# Altium PCB sciencelayout.PcbDoc
Units mil, origin at the board's own origin, x right, y up, seen from the top; angles counter-clockwise.
Board outline 2500 x 3500 mil, 2 copper layers (Top Layer, Bottom Layer); 97 components, 50 nets, 295 pads, 0 vias.
Unrouted connection lines stored in the file: 199.
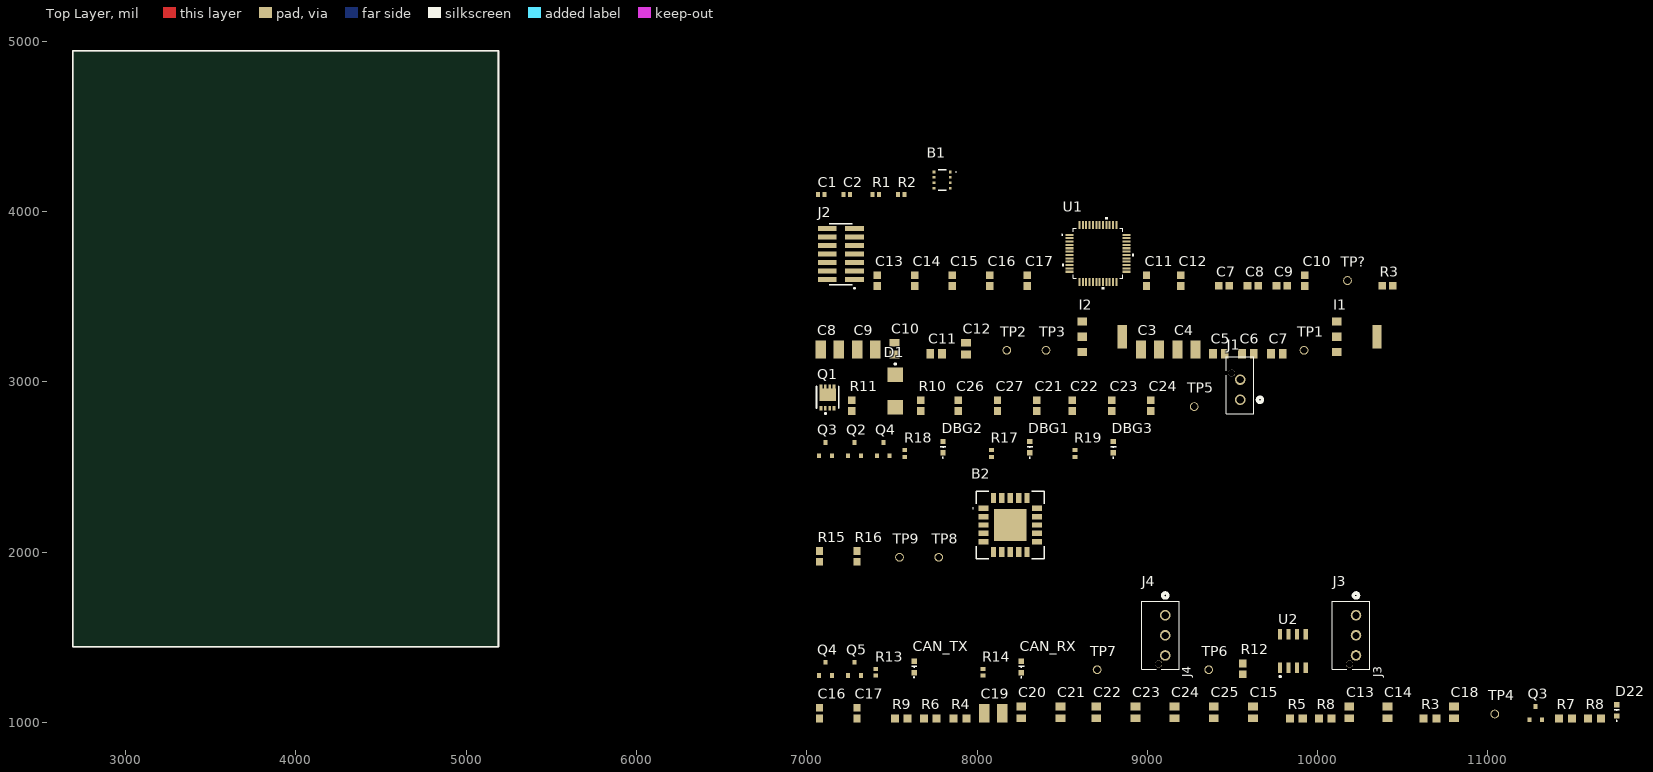
[diagram p0: Top Layer view]
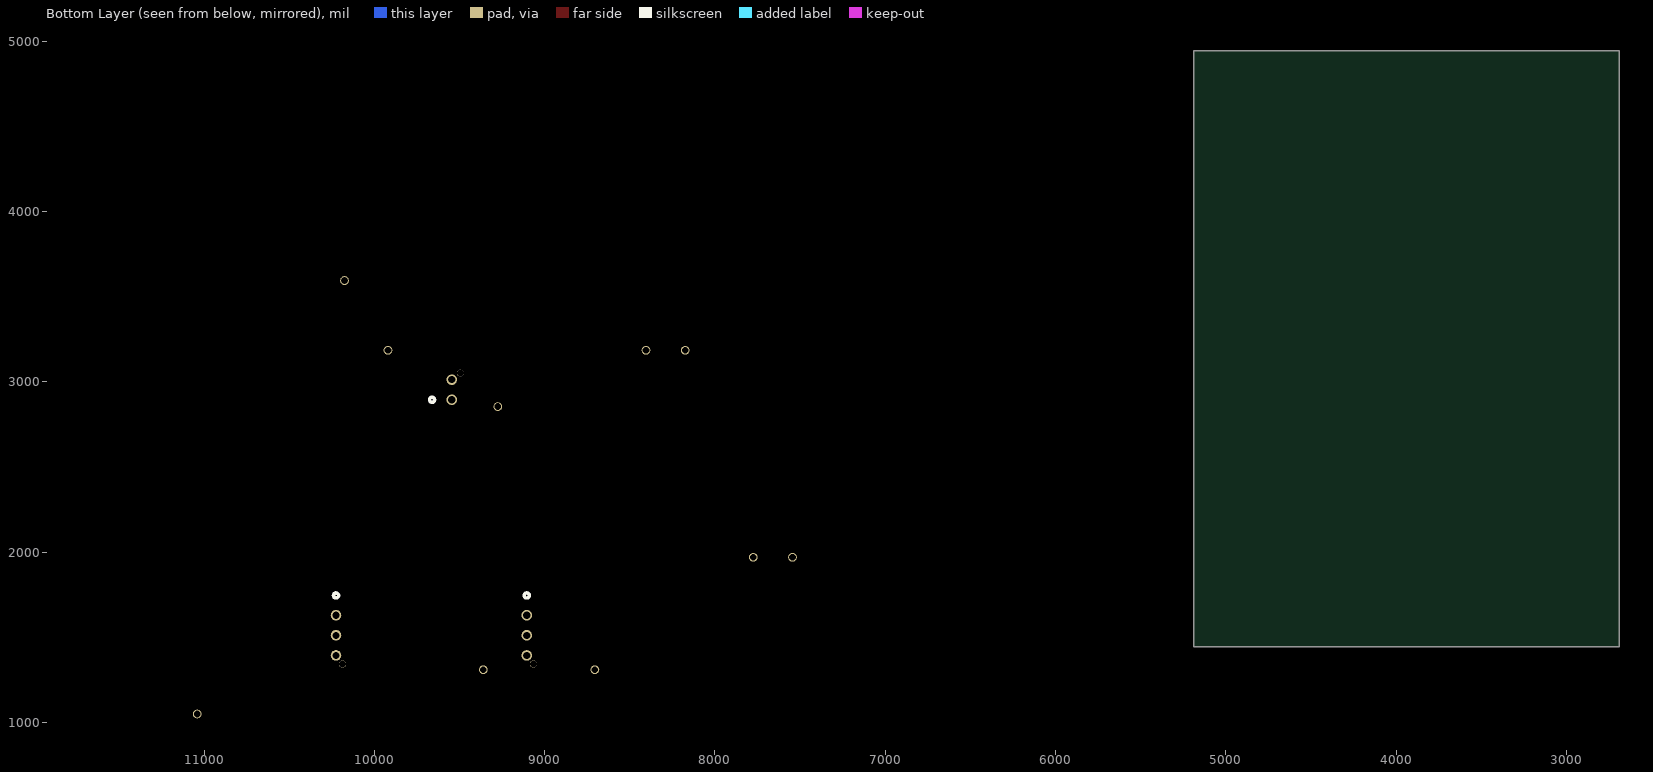
[diagram p1: Bottom Layer view, seen from below]

## Layer stack, top to bottom
Top Solder: solder mask 0.4, Solder Resist, Dk 3.5
Top Layer: signal copper 1.4
Dielectric 1: dielectric 12.6, FR-4, Dk 4.8
Bottom Layer: signal copper 1.4
Bottom Solder: solder mask 0.4, Solder Resist, Dk 3.5

## Board outline
2690,1445 2690,4945 5190,4945 5190,1445

## Design rules (kind name [scope] priority, off if disabled: settings)
Clearance [All] p1: gap=10 ignorepadtopadclearanceinfootprint=FALSE
PolygonConnect [All] p1: connectstyle=Relief reliefconductorwidth=10 reliefentries=4 polygonreliefangle="90 Angle" airgapwidth=10
RoutingVias [All] p1: holewidth=28 width=50 viastyle="Through Hole" minholewidth=28 minwidth=50 maxholewidth=28 maxwidth=50
SolderMaskExpansion [All] p1: expansion=0 istentingtop=FALSE
SupplyNets "Schematic Supply Nets_6" [InNet('VDD')] p1: voltage=0.000
SupplyNets "Schematic Supply Nets_5" [InNet('7V')] p2: voltage=0.000
SupplyNets "Schematic Supply Nets_4" [InNet('VBAT')] p3: voltage=0.000
SupplyNets "Schematic Supply Nets_3" [InNet('GND')] p4: voltage=0.000
SupplyNets "Schematic Supply Nets_2" [InNet('VBAT_FUSED_7')] p5: voltage=0.000
SupplyNets "Schematic Supply Nets_1" [InNet('5V')] p6: voltage=0.000
Width [All] p1: maxlimit=10 minlimit=10 preferedwidth=10
30 further rules are at their usual default settings.

## Classes and differential pairs
component class THP_Sensor: B1 C1 C2 R1 R2
component class MCU: C7 C8 C9 C10 C11 C12 C13 C14 C15 C16 C17 J2 R3 TP? U1
component class LDOs: C3 C4 C5 C6 C7 C8 C9 C10 C11 C12 I1 I2 TP1 TP2 TP3
component class "Input Power": C21 C22 C23 C24 C26 C27 D1 J1 Q1 R10 R11 TP5
component class Headers: J4 J5 J6 M2
component class "Debugging LED": DBG1 DBG2 DBG3 Q2 Q3 Q4 R17 R18 R19
component class CO2_Sensor: B2 R15 R16 TP8 TP9
component class CAN: CAN_RX CAN_TX J3 J4 Q4 Q5 R12 R13 R14 TP6 TP7 U2
component class "7V Buck": C13 C14 C15 C16 C17 C18 C19 C20 C21 C22 C23 C24 C25 D22 D23 L2 Q3 R3 R4 R5 R6 R7 R8 R9 TP4 U9

## Components (designator, comment, footprint, x,y, rotation, side; value= is the part's Value field where it differs from the comment)
B1 "BME688" BME688 7795,4185 r0 top
B2 "SCD43-D-R2" SCD43DR2 8195,2160 r0 top
C1 "CAP 0402" CAP-0402 7085,4100 r0 top
C2 "CAP 0402" CAP-0402 7235,4100 r0 top
C3 "CL32B106KMVNNWE" CAP-1210 9015,3190 r0 top
C4 "CL32B106KMVNNWE" CAP-1210 9230,3190 r0 top
C5 "CL21B104KBCNNNC" CAP-0805 9420,3165 r0 top
C6 "C0805C471K5RACTU" CAP-0805 9590,3165 r0 top
C7 "CAP 0603" CAP-0603 9450,3565 r0 top
C7 "CC0805JKX7R9BB105" CAP-0805 9760,3165 r0 top
C8 "CAP 0603" CAP-0603 9620,3565 r0 top
C8 "CL32B106KMVNNWE" CAP-1210 7135,3190 r0 top
C9 "CL32B106KMVNNWE" CAP-1210 7350,3190 r0 top
C9 "CAP 0603" CAP-0603 9790,3565 r0 top
C10 "CAP 0603" CAP-0603 9925,3595 r90 top
C10 "CL21B104KBCNNNC" CAP-0805 7515,3195 r90 top
C11 "CAP 0603" CAP-0603 8995,3595 r90 top
C11 "C0805C471K5RACTU" CAP-0805 7760,3165 r0 top
C12 "CAP 0603" CAP-0603 9195,3595 r90 top
C12 "CC0805JKX7R9BB105" CAP-0805 7935,3195 r90 top
C13 "CAP 0603" CAP-0603 7415,3595 r90 top
C13 "CAP 0805" CAP-0805 10185,1060 r90 top
C14 "CAP 0603" CAP-0603 7635,3595 r90 top
C14 "CAP 0805" CAP-0805 10410,1060 r90 top
C15 "CAP 0805" CAP-0805 9620,1060 r90 top
C15 "CAP 0603" CAP-0603 7855,3595 r90 top
C16 "GCM1885C1H302FA16J" CAP-0603 7075,1055 r90 top
C16 "CAP 0603" CAP-0603 8075,3595 r90 top
C17 "CAP 0603" CAP-0603 8295,3595 r90 top
C17 "CL10C6R8CB8NNNC" CAP-0603 7295,1055 r90 top
C18 "CL21B104KBCNNNC" CAP-0805 10800,1060 r90 top
C19 "CL32B106KMVNNWE" CAP-1210 8095,1055 r0 top
C20 "CC0805JKX7R9BB105" CAP-0805 8260,1060 r90 top
C21 "GCM188R71H104KA57D" CAP-0603 8350,2860 r90 top
C21 "CL21B104KBCNNNC" CAP-0805 8490,1060 r90 top
C22 "GRM1885C1H103JA01D" CAP-0603 8560,2860 r90 top
C22 "C0805C103K5RACTU" CAP-0805 8700,1060 r90 top
C23 "GRM1885C1H102JA01D" CAP-0603 8790,2860 r90 top
C23 "CL21B102KBANNNC" CAP-0805 8930,1060 r90 top
C24 "CL21C101JBANNNC" CAP-0805 9160,1060 r90 top
C24 "GRM1885C1H101JA01D" CAP-0603 9020,2860 r90 top
C25 "CL21C100CBANNNC" CAP-0805 9390,1060 r90 top
C26 "GRJ32ER71H106KE11L" CAP-0603 7890,2860 r90 top
C27 "GRJ32ER71H106KE11L" CAP-0603 8120,2860 r90 top
CAN_RX "BL-HKC36G-AV-TRB" LED-0603 8290,1270 r90 top
CAN_TX "BL-HKC36G-AV-TRB" LED-0603 7660,1270 r90 top
D1 "SMBJ40CA" "DO-214AA (SMBJ)" 7520,2945 r90 top
D22 "BL-HKC36G-AV-TRB" LED-0603 11785,1015 r90 top
DBG1 "BL-HKC36G-AV-TRB" LED-0603 8340,2560 r90 top
DBG2 "BL-HKC36G-AV-TRB" LED-0603 7830,2560 r90 top
DBG3 "BL-HKC36G-AV-TRB" LED-0603 8830,2560 r90 top
I1 "LM1117IMPX-3.3/NOPB" IC-SOT-223-4 10230,3265 r0 top
I2 "LM1117MPX-5.0/NOPB" IC-SOT-223-4 8735,3265 r0 top
J1 "2068320201" CONN_2068320000-SD_02_MOL 9545,2895 r0 top
J2 "FTSH-107-01-L-DV-K" SAMTEC_FTSH-107-01-L-DV-K 7200,3750 r90 top
J3 "2165712003" CONN_2165710003-SD_03_MOL 10225,1630 r90 top
J4 "2165712003" CONN_2165710003-SD_03_MOL 9105,1630 r90 top
Q1 "CSD18543Q3AT" IC-8VSONCLIP 7050,2810 r0 top
Q2 "T2N7002AK,LM" IC-SOT23-3 7280,2605 r0 top
Q3 "T2N7002AK,LM" IC-SOT23-3 7110,2605 r0 top
Q3 "T2N7002AK,LM" IC-SOT23-3 11280,1055 r0 top
Q4 "T2N7002AK,LM" IC-SOT23-3 7450,2605 r0 top
Q4 "T2N7002AK,LM" IC-SOT23-3 7110,1315 r0 top
Q5 "T2N7002AK,LM" IC-SOT23-3 7280,1315 r0 top
R1 "RES 0402" RES-0402 7405,4100 r0 top
R2 "RES 0402" RES-0402 7555,4100 r0 top
R3 "RES 0603" RES-0603 10410,3565 r0 top
R3 "CRCW08052M15FKEA" RES-0805 10660,1025 r0 top
R4 "ERA-6AEB104V" RES-0805 7900,1025 r0 top
R5 "RC0805FR-07178KL" RES-0805 9875,1025 r0 top
R6 "RC0805FR-0736K5L" RES-0805 7725,1025 r0 top
R7 "CRCW08051K00FKEA" RES-0805 11455,1025 r0 top
R8 "ERJ-6GEYJ241V" RES-0805 11625,1025 r0 top
R8 "CRCW080580K6FKEA" RES-0805 10045,1025 r0 top
R9 "RT0805BRD0710K4L" RES-0805 7555,1025 r0 top
R10 "RC0603JR-07200KL" RES-0603 7670,2860 r90 top
R11 "RC0603FR-07100KL" RES-0603 7265,2860 r90 top
R12 "RES 0603" RES-0603 9560,1315 r90 top
R13 "RES 0402" RES-0402 7405,1295 r90 top
R14 "RES 0402" RES-0402 8035,1295 r90 top
R15 "RES 0603" RES-0603 7075,1975 r90 top
R16 "RES 0603" RES-0603 7295,1975 r90 top
R17 "RES 0402" RES-0402 8085,2580 r90 top
R18 "RES 0402" RES-0402 7575,2580 r90 top
R19 "RES 0402" RES-0402 8575,2580 r90 top
TP1 "5003" TEST-POINT-0001 9920,3185 r0 top
TP2 "5003" TEST-POINT-0001 8175,3185 r0 top
TP3 "5003" TEST-POINT-0001 8405,3185 r0 top
TP4 "5003" TEST-POINT-0001 11040,1050 r0 top
TP5 "5003" TEST-POINT-0001 9275,2855 r0 top
TP6 "5003" TEST-POINT-0001 9360,1310 r0 top
TP7 "5003" TEST-POINT-0001 8705,1310 r0 top
TP8 "5003" TEST-POINT-0001 7775,1970 r0 top
TP9 "5003" TEST-POINT-0001 7545,1970 r0 top
TP? "5003" TEST-POINT-0001 10175,3595 r0 top
U1 "STM32G431CBT6" IC-LQFP48 8710,3755 r0 top
U2 "TCAN1044VDRQ1" IC-8SOIC 9855,1420 r0 top

## Footprints (in the part's own frame and the unit in brackets; to place one, negate y for a bottom-side part, rotate by r counter-clockwise, add the part's x,y. Pads: shape width x height; smd on the part's side, far side on the other; paste and mask are expansions set on the pad)
BME688 [mm]
  rect 0.4x0.4 smd: 1(1.2,1.2) 2(1.2,0.4) 3(1.2,-0.4) 4(1.2,-1.2) 5(-1.2,-1.2) 6(-1.2,-0.4) 7(-1.2,0.4) 8(-1.2,1.2)
  silkscreen extent -0.6,-1.5 2.1,1.5
CAP-0402 [mm]
  rect 0.6x0.7 smd: 1(-0.5,0) 2(0.5,0)
  body extent -0.5,-0.22 0.5,0.23, height 0.5
CAP-0603 [mm]
  rect 1.15x1.1 smd: 1(-0.8,0) 2(0.8,0)
  body extent -0.8,-0.45 0.8,0.45, height 0.8
CAP-0805 [mm]
  rect 1.16x1.47 smd: 1(-0.88,0) 2(0.88,0)
  body extent -1,-0.63 1,0.63, height 0.94
CAP-1210 [mm]
  rect 1.53x2.72 smd: 1(-1.341,0) 2(1.341,0)
  body extent -1.6,-1.25 1.6,1.25, height 2.7
CONN_2068320000-SD_02_MOL [mil]
  round 62 / inner round 60 / far side round 62 hole 42 paste-99999 mask+0: 1(0,0) 2(0,118.11)
  round 40 / inner round 60 / far side round 40 hole 40 unplated paste-99999 mask+0: 3(-50.39,156.69)
  silkscreen extent -81,-81 131,254, body extent -76,-76 76,249, height 392
CONN_2165710003-SD_03_MOL [mil]
  round 62 hole 42 paste-99999 mask+0: 1(0,0) 2(-118.11,0) 3(-236.22,0)
  round 42 hole 42 unplated paste-99999 mask+0: 4(-286.61,38.58)
  silkscreen extent -317,-81 131,139, body extent -312,-75 76,135, height 394
"DO-214AA (SMBJ)" [mm]
  rect 2.16x2.26 smd: 1(-2.416,0) 2(2.484,0)
  silkscreen extent 3.94,-0.13 4.19,0.12, body extent -2.72,-1.95 2.78,1.95, height 2.45
IC-8SOIC [mm]
  rect 0.6x1.5 smd: 1(-1.905,-2.5) 2(-0.635,-2.5) 3(0.635,-2.5) 4(1.905,-2.5) 5(1.905,2.5) 6(0.635,2.5) 7(-0.635,2.5) 8(-1.905,2.5)
  silkscreen extent -2.03,-3.93 -1.78,-3.69, body extent -2.45,-3 2.45,3, height 1.75
IC-8VSONCLIP [mm]
  rect 0.4x0.7 smd paste-100 mask+0.05: 1(2.812,0.877) 2(0.862,0.877) 2(1.512,0.877) 2(2.162,0.877) 3(0.862,4.077) 3(1.512,4.077) 3(2.162,4.077) 3(2.812,4.077)
  rect 2.45x1.9 smd paste-100 mask+0.05: 3(1.837,2.917)
  silkscreen extent 0.19,0.03 3.49,4.18, body extent 0.18,0.89 3.48,4.19, height 1.1
IC-LQFP48 [mil]
  rect 47x12 smd paste+0 mask+0: 1(-167.32,108.27) 2(-167.32,88.58) 3(-167.32,68.9) 4(-167.32,49.21) 5(-167.32,29.53) 6(-167.32,9.84) 7(-167.32,-9.84) 8(-167.32,-29.53) 9(-167.32,-49.21) 10(-167.32,-68.9) 11(-167.32,-88.58) 12(-167.32,-108.27) 25(167.32,-108.27) 26(167.32,-88.58) 27(167.32,-68.9) 28(167.32,-49.21) 29(167.32,-29.53) 30(167.32,-9.84) 31(167.32,9.84) 32(167.32,29.53) 33(167.32,49.21) 34(167.32,68.9) 35(167.32,88.58) 36(167.32,108.27)
  rect 12x47 smd paste+0 mask+0: 13(-108.27,-167.32) 14(-88.58,-167.32) 15(-68.9,-167.32) 16(-49.21,-167.32) 17(-29.53,-167.32) 18(-9.84,-167.32) 19(9.84,-167.32) 20(29.53,-167.32) 21(49.21,-167.32) 22(68.9,-167.32) 23(88.58,-167.32) 24(108.27,-167.32) 37(108.27,167.32) 38(88.58,167.32) 39(68.9,167.32) 40(49.21,167.32) 41(29.53,167.32) 42(9.84,167.32) 43(-9.84,167.32) 44(-29.53,167.32) 45(-49.21,167.32) 46(-68.9,167.32) 47(-88.58,167.32) 48(-108.27,167.32)
  silkscreen extent -214,-211 211,211, body extent -177,-177 177,177, height 63
IC-SOT23-3 [mm]
  rect 0.6x0.7 smd: 1(-0.95,-1) 2(0.95,-1) 3(0,1)
  body extent -1.46,-1.18 1.46,1.19, height 1.12
IC-SOT-223-4 [mm]
  rect 1.4x1.2 smd mask+0.07: 1(-3,2.3) 3(-3,-2.3) 4(-3,0)
  rect 1.4x3.5 smd: 2(3,0)
  body extent -3.5,-3.25 3.5,3.25, height 1.68
LED-0603 [mm]
  rect 0.8x0.8 smd: 1(2.291,0.751) 2(0.589,0.751)
  silkscreen extent -0.2,0.34 1.52,1.13, body extent 0.65,0.36 2.25,1.16, height 0.39
RES-0402 [mm]
  rect 0.6x0.7 smd: 1(-0.5,0) 2(0.5,0)
  body extent -0.5,-0.25 0.5,0.25, height 0.3
RES-0603 [mm]
  rect 1.15x1.1 smd: 1(-0.8,0) 2(0.8,0)
  body extent -0.8,-0.4 0.8,0.4, height 0.43
RES-0805 [mm]
  rect 1.2x1.2 smd: 1(-0.95,0) 2(0.95,0)
  body extent -1,-0.6 1,0.6, height 0.71
SAMTEC_FTSH-107-01-L-DV-K [mm]
  rect 0.74x2.79 smd: 01(-3.81,-2.035) 02(-3.81,2.035) 03(-2.54,-2.035) 04(-2.54,2.035) 05(-1.27,-2.035) 06(-1.27,2.035) 07(0,-2.035) 08(0,2.035) 09(1.27,-2.035) 10(1.27,2.035) 11(2.54,-2.035) 12(2.54,2.035) 13(3.81,-2.035) 14(3.81,2.035)
  silkscreen extent -5.19,-2.13 4.53,1.72, body extent -4.44,-2.82 4.44,3.02, height 5.96
SCD43DR2 [mm]
  rect 1.5x0.8 smd: 1(-4,2.5) 2(-4,1.25) 3(-4,0) 4(-4,-1.25) 5(-4,-2.5) 11(4,-2.5) 12(4,-1.25) 13(4,0) 14(4,1.25) 15(4,2.5)
  rect 0.8x1.5 smd: 6(-2.5,-4) 7(-1.25,-4) 8(0,-4) 9(1.25,-4) 10(2.5,-4) 16(2.5,4) 17(1.25,4) 18(0,4) 19(-1.25,4) 20(-2.5,4)
  rect 4.8x4.8 smd: 21(0,0)
  silkscreen extent -5.6,-5.05 5.05,5.05
TEST-POINT-0001 [mm] "2024 miniature test point"
  round 1.3 hole 1: 1(0,0)
  body extent -1.27,-1.27 1.27,1.27, height 4.57

## Part data
B1: "Gas sensor measuring relative humidity, barometric pressure, ambient temperature and gas (VOC)", Manufacturer_Name=BOSCH, Mouser Part Number=262-BME688, Arrow Part Number=BME688, Arrow Price/Stock=https://www.arrow.com/en/products/bme688/bosch-sensortec.html?utm_currency=USD&region=nac, Datasheet Link=https://www.bosch-sensortec.com/media/boschsensortec/downloads/datasheets/bst-bme688-ds000.pdf, Geometry.Height=1mm, Manufacturer_Part_Number=BME688, Mouser Price/Stock=https://www.mouser.co.uk/ProductDetail/Bosch-Sensortec/BME688?qs=IS%252B4QmGtzzqQoVDscqwx3A%3D%3D
B2: "Carbon Dioxide (CO2) Sensor Voltage 2.4V ~ 5.5V , 205mA , 400 kHz  -10C ~ 60C", Manufacturer_Name=Sensirion, Datasheet Link=https://sensirion.com/media/documents/48C4B7FB/67FE0194/CD_DS_SCD4x_Datasheet_D1.pdf, Geometry.Height=6.8mm, Manufacturer_Part_Number=SCD43-D-R2
C1 C2: capacitor=100nF, Voltage Rating=V
C3 C4 C8 C9 C19: library part "CAP 1210", Capacitance="10 uF", Voltage Rating=50V
C5 C10: library part "CAP 0805", Capacitance="100 nF", Voltage Rating=16V
C6 C11: library part "CAP 0805", Capacitance="470 pF", Voltage Rating=50V
C7 C8 C9 C11 C16 C17: Capacitance="100 nF", Voltage Rating=16V
C7 C12: library part "CAP 0805", Capacitance="1 uF", Voltage Rating=16V
C10 C12: Capacitance="4.7 uF", Voltage Rating=16V
C13: Capacitance="10 nF", Voltage Rating=50V
C13 C14: Capacitance="2.2 uF", Voltage Rating=V
C14 C15: Capacitance="1 uF", Voltage Rating=16V
C15: Capacitance="2.7 nF", Voltage Rating=V
C16: library part "CAP 0603", Capacitance="3 nF", Voltage Rating=V
C17: library part "CAP 0603", Capacitance=6.8F, Voltage Rating=V
C18 C21: library part "CAP 0805", Capacitance="100 nF", Voltage Rating=V
C20: library part "CAP 0805", Capacitance=1uF, Voltage Rating=V
C21: library part "CAP 0603", Capacitance=100nF, Voltage Rating=50V
C22: library part "CAP 0603", Capacitance=10nF, Voltage Rating=50V
C22: library part "CAP 0805", Capacitance="10 nF", Voltage Rating=V
C23: library part "CAP 0603", Capacitance=1nF, Voltage Rating=50V
C23: library part "CAP 0805", Capacitance="1 nF", Voltage Rating=V
C24: library part "CAP 0805", Capacitance="100 pF", Voltage Rating=V
C24: library part "CAP 0603", Capacitance=100pF, Voltage Rating=50V
C25: library part "CAP 0805", Capacitance="10 pF", Voltage Rating=V
C26: library part "CAP 0603", Capacitance=10uF, Voltage Rating=50V
C27: library part "CAP 0603", Capacitance=1uF, Voltage Rating=50V
CAN_RX CAN_TX D22 DBG1 DBG2 DBG3: library part LED-0001, "LED YELLOW CLEAR 0603 SMD", Forward Current=30mA, Forward Voltage=2V, ComponentLink1Description=Datasheet, ComponentLink1URL=https://www.americanbrightled.com/pdffiles/led-components/smt/BL-HKC36G-AV-TRB.pdf
D1: library part DIO-TVS-0001, "TVS DIODE 40VWM 64.5VC DO214AA", Current Rating=9.3A, Voltage Rating=64.5V, ComponentLink1Description=Datasheet, ComponentLink1URL=https://www.littelfuse.com/media?resourcetype=datasheets&itemid=09a6ae9a-73cb-4ac4-acac-e6dab92ab953&filename=littelfuse_tvs_diode_smbj_datasheet.pdf
I1: library part IC_LDO_3V3_0001, "IC REG LIN 3.3V 800MA SOT223-4", ComponentLink1Description="New link", ComponentLink1URL=https://www.ti.com/lit/ds/symlink/lm1117.pdf?HQS=dis-dk-null-digikeymode-dsf-pf-null-wwe&ts=1721700739746
I2: library part IC_LDO_5V_0001, "IC REG LINEAR 5V 800MA SOT223-4", ComponentLink1Description=Datasheet, ComponentLink1URL=https://www.ti.com/lit/ds/symlink/lm1117.pdf?HQS=dis-dk-null-digikeymode-dsf-pf-null-wwe&ts=1721700739746
J1: library part "CONN MF+ 2 PIN VERT", "Micro-Fit+ Vertical Header, Through Hole, 3.00mm Pitch, Dual Row, 2 Circuits, Tin (Sn) Plating, Glow-Wire Capable, Black, Tray", Manufacturer_Name="Molex Connector Corporation", Copyright="Copyright (C) 2025 Ultra Librarian. All rights reserved.", Manufacturer_Part_Number=2068320201, RefDes=RefDes, Type=Type
J2: library part CONN_Flashing-0001, "Connector Header Surface Mount 14 position 0.050\" (1.27mm)", Package=None, Availability=Unavailable, ComponentLink1Description=Datasheet, ComponentLink1URL=https://mm.digikey.com/Volume0/opasdata/d220001/medias/docus/6209/ftsh-1xx-xx-xxx-dv-xxx-xxx-x-xx-mkt.pdf, MF=Samtec, MP=FTSH-107-01-L-DV-K, Price=None
J3 J4: library part "CONN MF+ 3 PIN VERT", "Micro-Fit+ Vertical Header, Through Hole, 3.00mm Pitch, Single Row, 3 Circuits, 0.38Âµm Gold (Au) Plating, Glow-Wire Capable, Black", Manufacturer_Name="Molex Connector Corporation", Copyright="Copyright (C) 2026 Ultra Librarian. All rights reserved.", Manufacturer_Part_Number=2165712003, RefDes=RefDes, Type=Type
Q1: library part NMOS-60A-0001, "MOSFET N-CH 60V 12A/60A 8VSON", Continuous Current=60A, Voltage=60V, ComponentLink2Description=Datasheet, ComponentLink2URL=http://www.ti.com/lit/ds/symlink/csd18543q3a.pdf
Q2 Q3 Q3 Q4 Q4 Q5: library part NMOS-200MA-0001, "MOSFET N-CH 60V 200MA SOT23", Continuous Current=200mA, Voltage=60V, ComponentLink1Description=Datasheet, ComponentLink1URL=https://toshiba.semicon-storage.com/info/T2N7002AK_datasheet_en_20150401.pdf?did=29712&prodName=T2N7002AK
R1 R2: Resistance=4.7kΩ
  R2: Wattage=W
R3: Resistance=0Ω, Wattage="100 mW"
R3: library part "RES 0805", Resistance="2.15 MΩ", Wattage=W
R4: library part "RES 0805", Resistance=100kΩ, Wattage=W
R5: library part "RES 0805", Resistance=178kΩ, Wattage=W
R6: library part "RES 0805", Resistance=36.5kΩ, Wattage=W
R7: library part "RES 0805", Resistance=1kΩ, Wattage=W
R8: library part "RES 0805", Resistance=240Ω, Wattage=W
R8: library part "RES 0805", Resistance=80.6kΩ, Wattage=W
R9: library part "RES 0805", Resistance=10.4kΩ, Wattage=W
R10: library part "RES 0603", Power=100mW, Resistance=200kOhm
R11: library part "RES 0603", Resistance=100kOhm, Wattage=100mW
R12: Resistance=120Ω, Wattage=1/2W
R13 R14 R17 R18 R19: Resistance=100Ohm, Wattage=1/16W
R15 R16: Resistance=10kΩ, Wattage=W
TP1 TP2 TP3 TP4 TP5 TP6 TP7 TP8 TP9 TP?: library part TEST-POINT-0001, "Oranange PC Test Point, Miniature Phoisphor Bronze Silver Plating Through Hole Mounting Type"
U1: library part IC-STM32G431CBT6, "IC MCU 32BIT 128KB FLASH 48LQFP", Package=48LQFP, ComponentLink1Description=Datasheet, ComponentLink1URL=https://www.st.com/resource/en/datasheet/stm32g431cb.pdf
U2: library part IC-CAN-0001, "IC TRANSCEIVER 1/1 8SOIC", ComponentLink1Description=Datasheet, ComponentLink1URL=https://www.ti.com/lit/ds/symlink/tcan1044-q1.pdf?HQS=dis-dk-null-digikeymode-dsf-pf-null-wwe&ts=1728758303289&ref_url=https%253A%252F%252Fwww.ti.com%252Fgeneral%252Fdocs%252Fsuppproductinfo.tsp%253FdistId%253D10%2526gotoUrl%253Dhttps%253A%252F%252Fwww.ti.com%252Flit%252Fgpn%252Ftcan1044-q1

## Nets (pads, with @x,y where several pads share a name; then routed paths per layer and width w, separated by ;. In a path a pad name is that pad's centre, name@x,y a point inside that pad or via, vN(x,y) a via of type N, cw(c..) or ccw(c..) an arc to the next point about the centre after c; other vN are vias at no path point)
5V: C3.2 C9.2@7402.8,3190 C10.2@7515,3229.65 C11.2@7794.65,3165 C12.2@7935,3229.65 I1.3 I2.2 I2.4 R7.2 R8.2@11662.4,1025 TP3.1 U2.3
7V: C8.2@7187.8,3190 C19.2 C20.2 C21.2@8490,1094.65 C22.2@8700,1094.65 C23.2@8930,1094.65 C24.2@9160,1094.65 C25.2 I2.3 R8.2@10082.4,1025 TP2.1
" I2C_SDA": B1.3 B2.10 R1.1 R16.2 TP8.1 U1.42
BOOT: R3.2@10441.5,3565 U1.45
CAN_H: J3.3 R12.2 U2.7
CAN_L: J3.2 R12.1 U2.6
CAN_RX: TP7.1 U2.4
CAN_RX_LED: Q5.1 U1.25
CAN_Standby: U1.32
CAN_STB: U2.8
CAN_TX: TP6.1 U2.1
CAN_TX_LED: Q4.1@7072.6,1275.63 U1.26
COMP: C17.2@7295,1086.5 R6.2
"Debug LED1": Q2.1 U1.13
"Debug LED2": Q3.1@7072.6,2565.63 U1.14
"Debug LED3": Q4.1@7412.6,2565.63 U1.15
EN: R3.1@10622.6,1025 R4.2
FB: R8.1@10007.6,1025 R9.2
FDCAN1_RX: U1.33
FDCAN1_TX: U1.34
GND: B1.1 B1.5 B1.7 B2.6 B2.20 B2.21 C1.1 C2.1 C3.1 C4.1 C5.1 C6.1 C7.1 C8.1 C9.1 C10.1 C11.1 C12.1 C13.1 C14.1 C15.1 C16.1 C17.1@7295,1023.5 C17.2@8295,3626.5 C19.1 C20.1 C21.1 C22.1 C23.1 C24.1 C25.1 C26.1 C27.1 D1.1 I1.1 I2.1 J2.05 J2.07 J2.11 J3.1 J4.2 J4.3 Q1.3 Q2.2 Q3.2 Q4.2 Q5.2 R3.1@10378.5,3565 R4.1 R5.1 R9.1 R11.1 U1.19 U1.23 U1.35 U1.47 U2.2
I2C_SCL: B1.4 B2.9 R2.1 R15.2 TP9.1 U1.30
NetC16_2: C16.2@7075,1086.5 R6.1
NetCAN_RX_1: CAN_RX.1 R14.2
NetCAN_RX_2: CAN_RX.2 Q5.3
NetCAN_TX_1: CAN_TX.1 R13.2
NetCAN_TX_2: CAN_TX.2 Q4.3@7110,1354.37
NetD22_1: D22.1 R8.1@11587.6,1025
NetD22_2: D22.2 Q3.3@11280,1094.37
NetDBG1_1: DBG1.1 R17.2
NetDBG1_2: DBG1.2 Q2.3
NetDBG2_1: DBG2.1 R18.2
NetDBG2_2: DBG2.2 Q3.3@7110,2644.37
NetDBG3_1: DBG3.1 R19.2
NetDBG3_2: DBG3.2 Q4.3@7450,2644.37
NetJ1_1: J1.1 Q1.2
NetQ1_1: Q1.1 R10.1 R11.2
NRST: C17.1@8295,3563.5 J2.12 U1.7
PWRGD: Q3.1@11242.6,1015.63 R7.1
RT/CLK: R5.2
SS/TR: C15.2@9620,1094.65
SW: C18.1
SYSJTCK-SWCLK: J2.06 U1.38
SYSJTDO-SWO: J2.08 U1.40
SYSJTMS-SWDIO: J2.04 U1.37
VBAT: C21.2@8350,2891.5 C22.2@8560,2891.5 C23.2@8790,2891.5 C24.2@9020,2891.5 C26.2 C27.2 D1.2 J1.2 R10.2 TP5.1 U1.1
VBAT_FUSED_7: C13.2@10185,1094.65 C14.2@10410,1094.65 R3.2@10697.4,1025 TP4.1
VCP_RX: J2.13 U1.11
VCP_TX: J2.14 U1.10
VDD: B1.2 B1.6 B1.8 B2.7 B2.19 C1.2 C2.2 C4.2 C5.2 C6.2 C7.2 C8.2@9651.5,3565 C9.2@9821.5,3565 C10.2@9925,3626.5 C11.2@8995,3626.5 C12.2@9195,3626.5 C13.2@7415,3626.5 C14.2@7635,3626.5 C15.2@7855,3626.5 C16.2@8075,3626.5 I1.2 I1.4 J2.03 J4.1 J4.4 R1.2 R2.2 R13.1 R14.1 R15.1 R16.1 R17.1 R18.1 R19.1 TP1.1 TP?.1 U1.20 U1.21 U1.24 U1.36 U1.48 U2.5
pads on no net: B2.1 B2.2 B2.3 B2.4 B2.5 B2.8 B2.11 B2.12 B2.13 B2.14 B2.15 B2.16 B2.17 B2.18 C18.2 J1.3 J2.01 J2.02 J2.09 J2.10 J3.4 U1.2 U1.3 U1.4 U1.5 U1.6 U1.8 U1.9 U1.12 U1.16 U1.17 U1.18 U1.22 U1.27 U1.28 U1.29 U1.31 U1.39 U1.41 U1.43 U1.44 U1.46

## Silkscreen, mask and mechanical layers (free items; w line width, h text height)
Top Overlay:
  the board outline again, w10